# Altium PCB NewTrackerBoard.PcbDoc (part 4 of 4)
Units mm, origin at the board's own origin, x right, y up, seen from the top; angles counter-clockwise.
Board outline 47 x 47 mm, 4 copper layers (L1 (SIG), L2 (GND), L3 (GND), L4 (SIG + PWR)), stack 1.566 mm thick; 77 components, 57 nets, 308 pads, 297 vias.
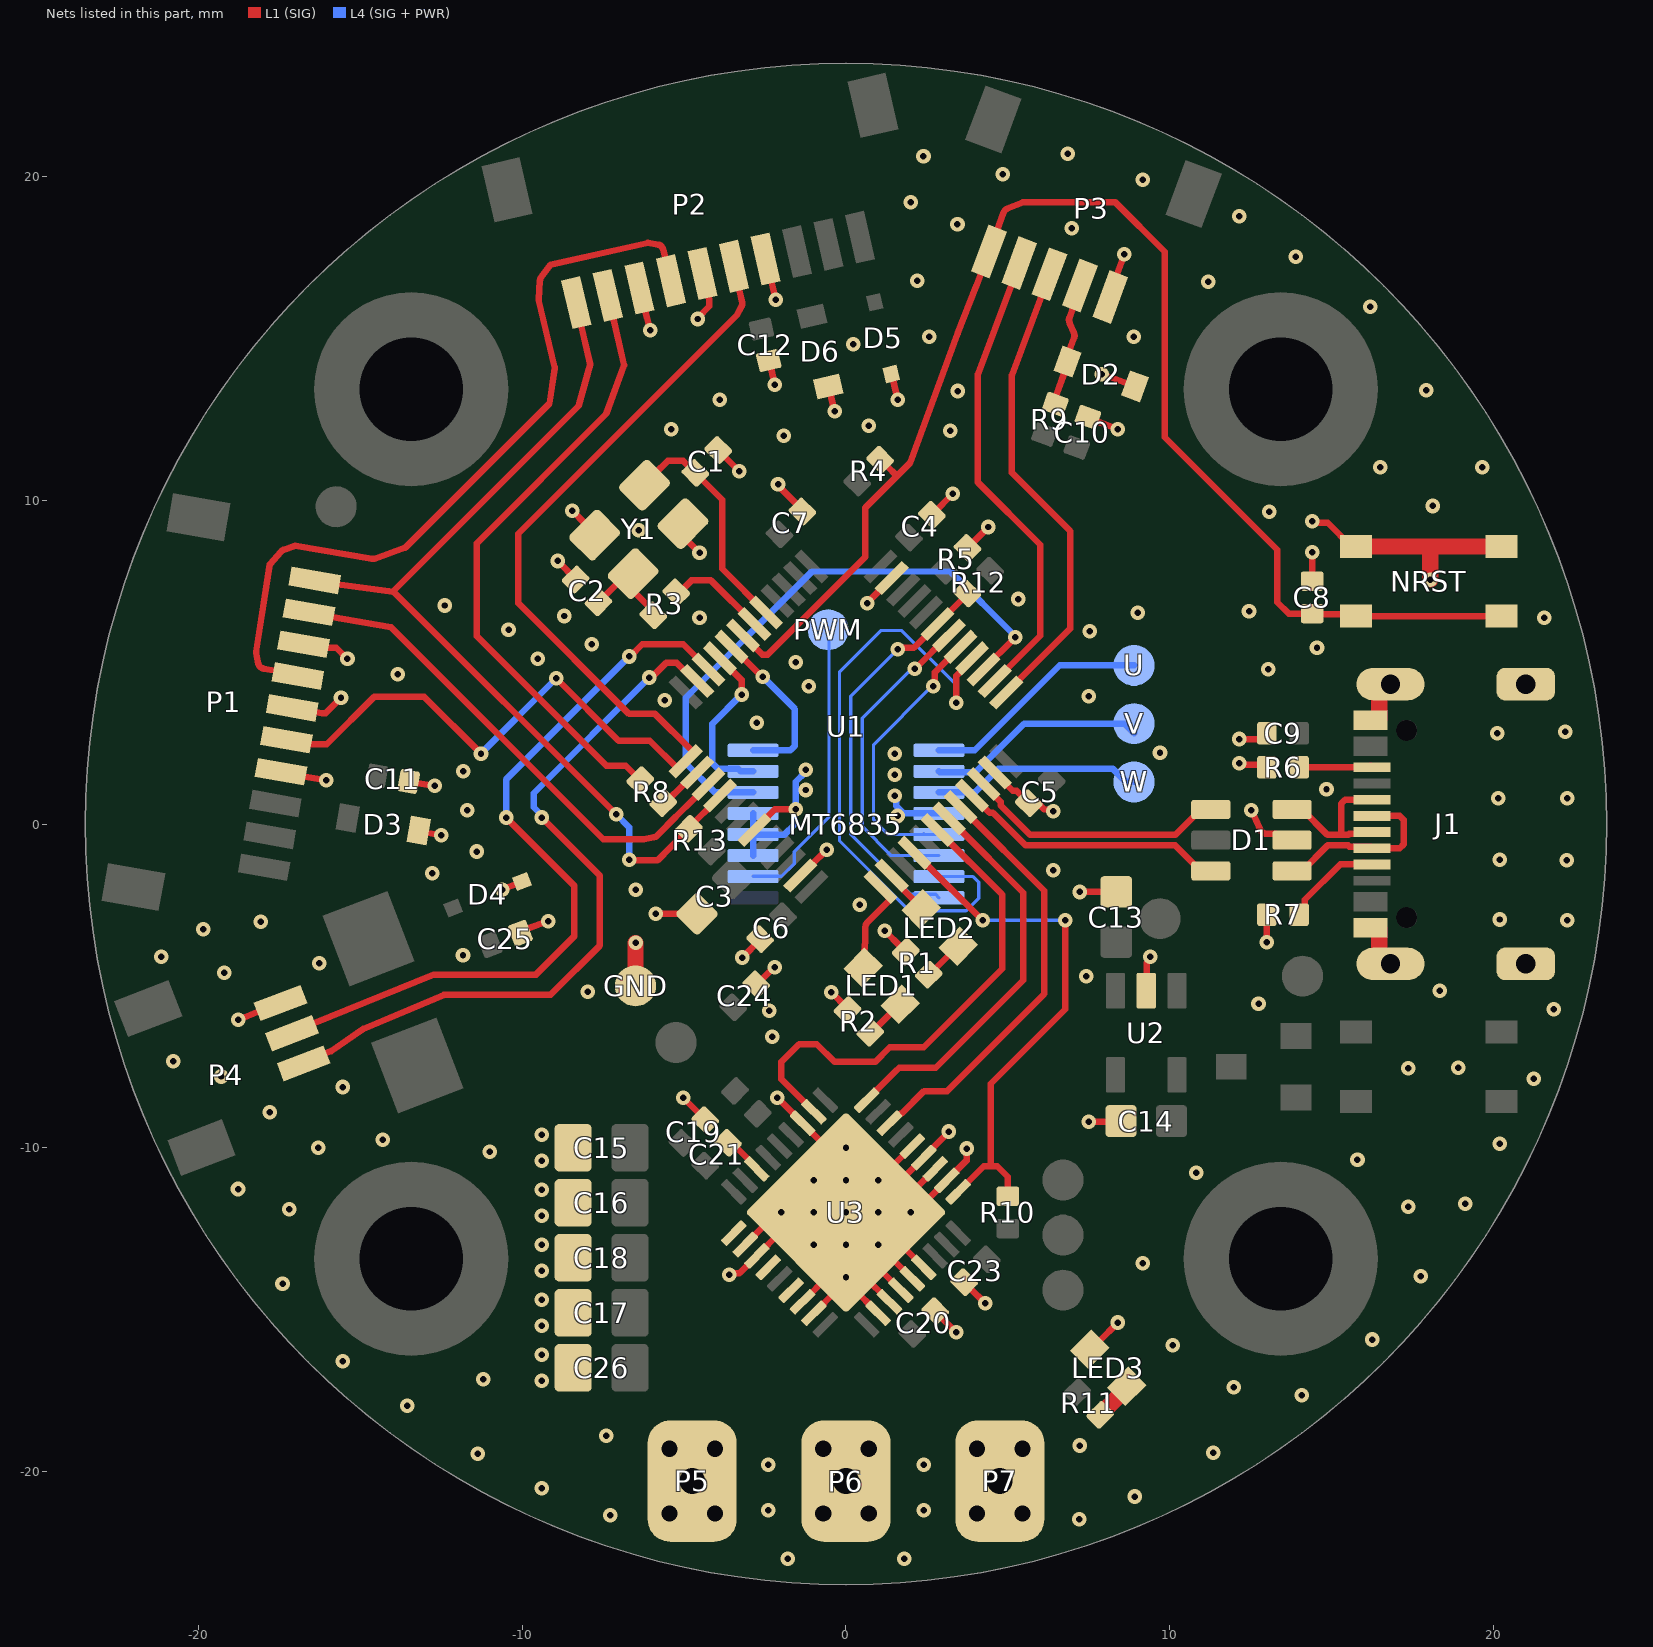
[diagram p4: the nets of this part, all layers, seen from the top]

## Via types
v1: diameter 0.45, hole 0.2, L1 (SIG) to L4 (SIG + PWR), tented both sides, 297 vias

## Nets (pads, with @x,y where several pads share a name; then routed paths per layer and width w, separated by ;. In a path a pad name is that pad's centre, name@x,y a point inside that pad or via, vN(x,y) a via of type N, cw(c..) or ccw(c..) an arc to the next point about the centre after c; other vN are vias at no path point) (continued)
DRV_LED: LED3.A R11.1 | length 1.2
  L1 (SIG) w0.5: R11.1@7.854,-18.254 7.921,-18.179 8.383,-17.717 ccw(c8.029,-17.364) 8.413,-17.684 LED3.A@8.673,-17.373
ENC_U: MT6835.1 U.1 | length 7.1
  L4 (SIG + PWR) w0.2: MT6835.1@2.87,2.275 3.975,2.275 6.6,4.9 U.1@8.9,4.9
ENC_V: MT6835.2 V.1 | length 6.8
  L4 (SIG + PWR) w0.2: MT6835.2@2.87,1.625 2.895,1.6 4,1.6 5.5,3.1 8.6,3.1 V.1@8.9,2.8
ENC_W: MT6835.3 W.1 | length 6.5
  L4 (SIG + PWR) w0.2: MT6835.3@2.87,0.975 3.975,0.975 4.7,1.7 8.248,1.7 8.648,1.3 W.1@8.9,1.3
FAULT_N: R10.1 U1.28 U3.28 | length 16.7
  L1 (SIG) w0.102: v1@6.775,-3 v1(6.775,-2.975)
  L1 (SIG) w0.2: U1.28@2.121,-0.889 2.121,-0.896 2.35,-1.125 2.366,-1.125 4.216,-2.975 v1(4.225,-2.975) ; U3.28@3.465,-11.364 4.253,-10.575 4.475,-10.575 ; R10.1@5,-11.5 5,-10.9 4.675,-10.575 4.475,-10.575 ; v1@6.775,-3 6.775,-5.725 4.475,-8.025 4.475,-10.575
  L4 (SIG + PWR) w0.102: v1(4.225,-2.975) v1(6.775,-2.975)
GND: C1.1 C2.1 C3.1 C4.1 C5.1 C6.1 C7.1 C8.1 C9.1 C10.1 C11.1 C12.2 C13.1 C14.1 C15.1 C16.1 C17.1 C18.1 C19.1 C20.1 C23.1 C24.2 C25.1 C26.1 D1.2 D2.A D3.A D4.1 D5.1 D6.A GND.1 J1.A1_B12 J1.B1_A12 J1.SH1 J1.SH2 J1.SH3 J1.SH4 LED3.C MT6835.4 MT6835.11 MT6835.12 MT6835.13 NRST.3 NRST.4 P1.3 P1.5 P1.7 P2.4 P2.6 P2.8 P3.1 P4.1 R1.1 R2.2 R5.1 R6.2 R7.1 U1.19 U1.23 U1.35 U1.47 U2.2 U3.3 U3.11 U3.12 U3.16 U3.17 U3.20 U3.21 U3.22 U3.23 U3.24 U3.29 U3.30 U3.31 U3.32 U3.37 Y1.2 Y1.4 | length 90.9
  L1 (SIG) w0.2: v1(-18.775,-6.05) -18.113,-5.783 -17.531,-5.5 P4.1@-17.5,-5.5 ; P1.7@-17.454,1.616 -16.793,1.481 v1(-16.05,1.35) ; P1.5@-17.107,3.586 -16.442,3.468 -16.178,3.422 -16.078,3.422 v1(-15.6,3.9) ; P1.7@-16.847,1.415 P1.7@-16.804,1.415 ; P1.3@-16.76,5.555 -16.093,5.452 -16.071,5.448 -15.748,5.448 v1(-15.4,5.1) ; C11.1@-13.508,1.313 -13.311,1.278 -12.742,1.178 ccw(c-12.707,1.375) -12.707,1.175 v1(-12.7,1.175) ; D3.A@-12.994,-0.255 D3.A@-13.2,-0.2 -12.995,-0.263 v1(-12.5,-0.35) ; v1(-10.625,-2.025) -10.14,-1.839 D4.1@-10.007,-1.781 ; C25.1@-10.054,-3.379 -9.906,-3.303 -9.889,-3.251 v1(-9.2,-3) ; v1(-8.9,8.125) -8.9,8.112 -8.354,7.566 C2.1@-8.354,7.554 ; v1(-8.45,9.675) -8.044,9.269 -8.044,9.222 -8.058,9.208 -7.789,8.958 Y1.2@-7.765,8.923 ; P2.8@-6.409,16.656 P2.8@-6.384,16.556 -6.232,16.004 -6.151,15.653 ccw(c-5.956,15.698) -6.15,15.65 ; -6.15,15.649 v1(-6.05,15.25) ; v1(-5.875,-2.775) -5.001,-2.774 C3.1@-4.976,-2.749 ; Y1.4@-5.035,9.277 -5.035,8.885 v1(-4.525,8.375) ; v1(-5.025,-8.45) -5.025,-8.459 -4.346,-9.137 C19.1@-4.346,-9.146 ; v1(-4.575,15.6) -4.575,15.642 -4.225,15.992 -4.225,16.207 ; P2.6@-4.46,17.106 -4.448,17.004 -4.403,16.626 -4.282,16.454 -4.225,16.208 ; C1.1@-3.946,11.554 -3.946,11.546 v1(-3.3,10.9) ; v1(-3.6,-13.925) -3.552,-13.877 -3.291,-13.877 -2.914,-13.5 -2.9,-13.5 -2.9,-13.486 U3.12@-2.758,-13.344 -2.014,-12.6 U3.37@-1.9,-12.6 ; U3.11@-3.338,-13.216 U3.11@-3.111,-12.99 -2.121,-12 v1(-2,-12) v1(-1,-12) v1(0,-12) v1(0,-11) 0,-10.525 -0.725,-9.8 -0.734,-9.809 -0.777,-9.809 -1.225,-9.361 U3.3@-1.225,-9.325 ; v1(-3.2,-4.125) -2.654,-3.579 C6.1@-2.654,-3.554 ; U1.19@-2.828,-0.182 -2.828,-0.178 -2.196,0.454 -1.554,0.454 v1(-1.55,0.45) ; C24.2@-2.624,-4.825 -2.224,-4.425 v1(-2.2,-4.425) ; P2.4@-2.487,17.456 -2.314,16.803 v1(-2.175,16.2) ; C12.2@-2.388,14.313 -2.326,14.122 v1(-2.2,13.575) ; v1(-2.125,-8.45) -1.475,-9.1 -1.45,-9.1 -1.344,-9.206 U3.3@-1.344,-9.231 ; v1(-2.1,10.5) -2.1,10.454 -1.346,9.7 C7.1@-1.346,9.654 ; U1.23@-1.414,-1.596 -1.411,-1.573 -1.054,-1.254 v1(-0.6,-0.8) ; U3.3@-1.35,-9.225 U3.3@-1.344,-9.231 ; U3.16@-1.344,-14.758 -1.344,-14.744 -1.2,-14.6 -1.186,-14.6 -0.7,-14.114 U3.37@-0.7,-14 ; U3.3@-1.344,-9.242 U3.3@-1.344,-9.231 ; D6.A@-0.55,13.516 -0.488,13.312 -0.378,12.836 ccw(c-0.183,12.881) -0.373,12.819 v1(-0.35,12.75) v1@-0.373,12.818 ; v1(-0.45,-5.2) 0.046,-5.696 R2.2@0.046,-5.746 ; U3.37@-0.3,-14.4 -0.3,-14.421 U3.17@-0.99,-15.111 ; U3.37@0.3,-14.4 0.3,-14.421 0.879,-15 0.9,-15 0.99,-15.09 U3.20@0.99,-15.111 ; U3.37@0.6,-14 0.6,-14.014 1.286,-14.7 1.3,-14.7 1.344,-14.744 U3.21@1.344,-14.758 ; v1(0.65,6.825) 0.65,6.828 1.414,7.593 U1.47@1.414,7.596 ; U3.37@1,-13.7 1,-13.707 1.693,-14.4 1.7,-14.4 U3.22@1.697,-14.403 ; v1(1.2,-3.3) 1.7,-3.8 R1.1@1.846,-3.946 ; U3.37@1.4,-13.4 U3.23@2.051,-14.051 ; D5.1@1.4,13.9 1.447,13.762 v1(1.6,13.1) ; U3.37@1.425,-10.525 1.475,-10.525 2.025,-9.975 U3.32@2.025,-9.95 ; U3.37@1.7,-13 1.707,-13 2.2,-13.493 2.2,-13.5 2.397,-13.697 U3.24@2.404,-13.697 ; U3.37@1.75,-10.85 1.769,-10.869 1.838,-10.869 U3.31@2.404,-10.303 2.404,-10.287 3.175,-9.516 v1(3.175,-9.5) ; U3.32@2.026,-9.949 U3.32@2.051,-9.949 ; U3.37@2.075,-11.325 2.089,-11.325 U3.30@2.758,-10.656 ; U3.37@2.6,-11.525 2.875,-11.25 2.875,-11.248 3.725,-10.398 v1(3.725,-10.025) ; C4.1@2.654,9.554 2.725,9.625 v1(3.3,10.2) ; C20.1@2.754,-15.046 2.778,-15.062 2.927,-15.227 v1(3.4,-15.7) ; C23.1@3.646,-14.154 3.823,-14.33 v1@4.293,-14.8 ; R5.1@3.754,8.529 v1(4.4,9.175) ; U1.35@4.596,1.586 4.596,1.596 4.6,1.6 4.6,1.575 5.15,1.025 5.268,1.025 C5.1@5.646,0.646 5.929,0.646 6.128,0.448 6.352,0.448 v1(6.4,0.4) ; v1(7.225,-2.1) 8.345,-2.1 C13.1@8.35,-2.095 ; C10.1@7.471,12.57 7.696,12.456 v1(8.4,12.2) ; v1(7.5,-9.2) 8.131,-9.2 C14.1@8.495,-9.175 ; LED3.C@7.527,-16.227 7.583,-16.129 7.808,-15.992 v1(8.4,-15.4) ; v1(7.9,13.9) 8.735,13.596 D2.A@8.933,13.52 ; P3.1@8.161,16.343 8.197,16.577 8.375,16.983 v1(8.6,17.6) ; U2.2@9.275,-5.15 9.275,-4.925 9.287,-4.912 9.287,-4.28 9.4,-4.168 v1(9.4,-4.1) ; v1(12.15,1.875) 12.198,1.827 12.923,1.827 R6.2@13,1.75 ; v1(12.15,2.625) 12.8,2.625 12.997,2.792 C9.1@13,2.8 ; v1(12.525,0.425) 12.798,-0.184 ccw(c12.98,-0.102) 12.977,-0.301 ; R7.1@12.8,-2.825 13,-3.025 v1(13,-3.65) ; 12.978,-0.302 13.275,-0.305 D1.2@13.78,-0.5 ; C8.1@14.4,7.5 14.4,7.7 v1(14.4,8.4) ; v1(14.4,9.35) 14.448,9.302 14.883,9.302 15.61,8.575 NRST.4@15.75,8.575 ; U3.17@-0.99,-15.111 -1.179,-15.3 -1.2,-15.3 U3.17@-0.99,-15.111
  L1 (SIG) w0.5: GND.1@-6.5,-5 v1(-6.5,-3.675) ; C3.1@-4.652,-2.752 -4.652,-2.773 C3.1@-4.65,-2.775 ; NRST.4@15.75,8.575 18.05,8.575 ; J1.A1_B12@16.195,-3.2 16.42,-3.2 16.47,-3.25 16.47,-4.13 J1.SH1@16.4,-4.2 ; J1.B1_A12@16.195,3.2 16.42,3.2 16.47,3.25 16.47,4.089 16.701,4.32 J1.SH2@16.82,4.32 ; v1(18.05,7.55) 18.05,8.575 ; NRST.3@20.25,8.575 18.05,8.575
  L4 (SIG + PWR) w0.2: MT6835.11@-2.87,-0.975 MT6835.12@-2.87,-0.325 ; MT6835.13@-2.87,0.325 MT6835.12@-2.87,-0.325 ; v1(-1.25,1.675) -1.25,1.607 -1.55,1.307 v1(-1.55,0.45) -1.598,0.402 -1.598,-0.023 -1.9,-0.325 MT6835.12@-2.87,-0.325 ; v1(1.5,0.875) 1.548,0.827 1.548,0.562 1.785,0.325 MT6835.4@2.87,0.325
  other v1: -1.8,-22.7 1.8,-22.7 7.2,-21.475 -7.281,-21.35 -2.4,-21.2 2.4,-21.2 8.925,-20.775 -9.4,-20.525 -2.4,-19.8 2.4,-19.8 -11.375,-19.45 11.35,-19.425 7.219,-19.2 -7.4,-18.9 -13.55,-17.975 14.075,-17.65 11.975,-17.4 -9.4,-17.2 -11.206,-17.15 -15.55,-16.6 -9.4,-16.4 10.094,-16.1 16.25,-15.925 -9.4,-15.5 4.3,-14.8 -9.4,-14.7 -17.406,-14.2 0,-14 17.75,-13.975 -9.4,-13.8 9.169,-13.575 -9.4,-13 -1,-13 0,-13 1,-13 -9.4,-12.1 1,-12 2,-12 -17.2,-11.9 17.375,-11.825 19.125,-11.725 -9.4,-11.3 -18.781,-11.276 -1,-11 1,-11 10.819,-10.775 -9.4,-10.4 15.8,-10.375 -11.006,-10.125 -16.3,-10 0,-10 20.2,-9.875 -14.306,-9.75 -9.4,-9.6 -17.8,-8.9 -15.55,-8.125 21.25,-7.875 -19.3,-7.8 17.369,-7.55 18.919,-7.525 -20.781,-7.325 -2.275,-6.575 -2.375,-5.775 21.869,-5.725 12.744,-5.55 -7.981,-5.176 18.344,-5.15 7.419,-4.7 -19.2,-4.6 -16.275,-4.3 -21.156,-4.1 -11.831,-4.05 -19.85,-3.25 -18.075,-3.025 22.275,-2.975 20.2,-2.95 0.419,-2.5 -6.5,-2.025 -12.781,-1.525 6.4,-1.425 22.269,-1.125 20.2,-1.1 -11.4,-0.85 1.592,0.248 -11.7,0.425 20.15,0.8 22.275,0.8 -1.25,1.05 14.844,1.075 1.5,1.525 -11.825,1.625 1.5,2.175 9.7,2.2 20.119,2.8 22.219,2.85 -2.756,3.125 -5.6,3.825 7.5,3.95 -1.156,4.25 -13.85,4.625 13.05,4.775 -1.55,5 -9.525,5.1 14.55,5.45 -7.85,5.55 7.525,5.95 -10.425,6 -4.525,6.375 21.575,6.375 -8.706,6.425 9.019,6.524 12.45,6.575 -12.4,6.75 5.325,6.95 -6.4,9.075 13.075,9.65 18.119,9.824 16.5,11.025 19.65,11.025 -1.925,12 3.225,12.15 -5.4,12.2 0.7,12.3 -3.9,13.1 3.45,13.375 17.925,13.4 0.219,14.824 2.575,15.05 8.894,15.05 16.2,15.975 11.194,16.75 2.2,16.775 13.9,17.525 6.975,18.4 3.444,18.525 12.144,18.775 1.994,19.2 9.169,19.9 4.844,20.075 2.394,20.625 6.85,20.7
NRST: C8.2 NRST.1 NRST.2 P3.5 R4.1 U1.7 | length 43.5
  L1 (SIG) w0.2: U1.7@-3.532,6.182 -3.248,5.898 U1.7@-3.182,5.828 -2.586,5.233 -2.421,5.233 0.6,8.254 0.6,9.775 1.575,10.75 ; R4.1@1.054,11.254 1.149,11.218 1.239,11.086 1.575,10.75 ; 4.018,16.605 3.45,15.15 1.975,11.15 1.575,10.75 ; 4.019,16.606 ccw(c3.832,16.678) 4.024,16.62 cw(c4.215,16.562) 4.027,16.631 4.184,17.05 P3.5@4.416,17.683 ; P3.5@4.129,17.07 P3.5@4.213,17.25 ; P3.5@4.395,17.692 4.402,17.711 4.664,18.333 4.867,18.89 cw(c5.055,18.821) 4.979,19.007 5.461,19.2 8.325,19.2 9.85,17.675 9.85,11.95 13.325,8.475 13.325,6.85 13.675,6.5 C8.2@14.4,6.5 14.65,6.486 15.355,6.486 NRST.2@15.75,6.425 16.145,6.423 19.855,6.423 20.243,6.421 NRST.1@20.25,6.425
OSC: C2.2 R3.1 Y1.3 | length 3
  L1 (SIG) w0.2: C2.2@-7.646,6.846 -6.943,7.55 -6.875,7.55 -6.69,7.735 Y1.3@-6.577,7.735 -6.577,7.202 -5.954,6.579 R3.1@-5.954,6.446
OSC_IN: C1.2 U1.5 Y1.1 | length 7.3
  L1 (SIG) w0.2: Y1.1@-6.223,10.465 -5.882,10.843 -5.5,11.225 -5.032,11.225 C1.2@-4.654,10.846 -3.825,10.018 -3.825,7.886 U1.5@-2.475,6.536
OSC_OUT: R3.2 U1.6 | length 3.1
  L1 (SIG) w0.2: R3.2@-5.246,7.154 -5.146,7.154 -4.775,7.525 -4.171,7.525 U1.6@-2.828,6.182
OUT1: P5.1 U3.10
OUT2: P6.1 U3.13
OUT3: P7.1 U3.15
PWM: MT6835.10 PWM.1 | length 9
  L4 (SIG + PWR) w0.102: MT6835.10@-2.87,-1.625 -2.862,-1.617 -1.992,-1.617 -1.6,-1.225 -1.6,-0.85 -0.523,0.227 -0.523,5.848 PWM.1@-0.525,5.85
RETURN: P1.4 P2.7 | length 24.3
  L1 (SIG) w0.2: -17.377,8.467 ccw(c-17.309,8.279) -17.459,8.411 -17.8,8.025 -18.225,5.3 -18.152,4.952 ccw(c-17.956,4.993) -17.991,4.796 -17.591,4.726 P1.4@-16.933,4.57 ; -17.376,8.467 -17.019,8.595 -14.648,8.19 -14.631,8.187 -14.579,8.187 -13.61,8.54 -9.159,12.991 -9.003,14.076 -9.003,14.114 -9.498,16.196 -9.454,16.79 cw(c-9.255,16.776) -9.414,16.897 -9.125,17.275 -6.125,17.95 -5.805,17.897 cw(c-5.838,17.699) -5.643,17.744 -5.572,17.436 P2.7@-5.41,16.781
S_LED1: LED1.C R2.1 | length 1.3
  L1 (SIG) w0.2: R2.1@0.754,-6.454 0.939,-6.286 1.405,-5.821 LED1.C@1.673,-5.573
S_LED2: LED2.C R1.2 | length 1.3
  L1 (SIG) w0.2: R1.2@2.554,-4.654 2.742,-4.489 3.207,-4.023 3.312,-3.984 LED2.C@3.473,-3.773
SPI1_CS: P1.1 P2.10 R13.2 U1.16 | length 28.7
  L1 (SIG) w0.2: P1.1@-16.412,7.525 -16.384,7.484 -16.374,7.469 -16.317,7.413 P1.1@-16.028,7.362 ; P1.1@-15.725,7.4 -14,7.175 -13.991,7.191 v1(-7.1,0.3) ; -13.988,7.187 -8.253,12.922 -7.975,13.924 ; P2.10@-8.358,16.206 -8.336,16.105 -8.216,15.546 -7.903,14.19 -7.975,13.926 ; v1(-6.7,-1.1) -6.675,-1.125 -5.825,-1.125 -5.625,-0.925 -5.625,-0.918 R13.2@-4.854,-0.146 -4.854,-0.116 -3.987,0.75 -3.975,0.75 -3.889,0.836 U1.16@-3.889,0.879
  L4 (SIG + PWR) w0.2: v1(-7.1,0.3) -6.7,-0.1 v1(-6.7,-1.1)
SPI1_MISO: P2.9 R8.2 | length 19.2
  L1 (SIG) w0.2: P2.9@-7.277,16.324 -7.224,15.775 -6.855,14.176 -7.405,12.67 -11.4,8.675 -11.4,5.8 -7.4,1.8 -6.8,1.8 R8.2@-6.354,1.354
SPI1_MISO2: R8.1 U1.14 | length 1.5
  L1 (SIG) w0.2: R8.1@-5.646,0.646 -5.591,0.646 -4.975,1.262 -4.957,1.243 -4.614,1.586 U1.14@-4.596,1.586
SPI1_MOSI: P1.2 U1.15 | length 16
  L1 (SIG) w0.2: P1.2@-16.421,6.375 P1.2@-16.586,6.54 -15.925,6.404 -14.048,6.073 -7.5,-0.475 -6.25,-0.475 -5.934,-0.412 -5.875,-0.4 -5.832,-0.357 -5.532,-0.057 -5.532,-0.047 -4.953,0.532 -4.943,0.532 U1.15@-4.243,1.232
SPI1_SCK: P1.6 P2.5 U1.13 | length 36.4
  L1 (SIG) w0.2: P1.6@-17.2,2.6 -17.065,2.465 -16.213,2.465 -16.209,2.46 -16.043,2.46 -14.579,3.925 -13.025,3.925 v1(-11.275,2.175) ; v1(-8.95,4.5) -7.025,2.575 -6.06,2.575 -5.224,1.739 -5.15,1.739 U1.13@-4.95,1.939 ; U1.13@-4.8,2.3 -5.9,3.4 -6.7,3.4 -10.125,6.825 -10.125,8.964 -3.375,15.714 -3.228,15.997 -3.205,16.041 -3.205,16.112 -3.334,16.673 P2.5@-3.486,17.331
  L4 (SIG + PWR) w0.2: v1(-11.275,2.175) v1(-8.95,4.5)
SPI3_CS: MT6835.8 R12.2 U1.43 | length 12.7
  L1 (SIG) w0.2: v1(1.6,5.4) 1.648,5.448 2.098,5.448 U1.43@2.832,6.182 ; U1.43@2.828,6.182 U1.43@2.832,6.182 ; R12.2@3.746,7.121 3.746,7.096 U1.43@2.832,6.182
  L4 (SIG + PWR) w0.102: v1(1.6,5.4) 0.15,3.95 0.15,-0.323 2,-2.173 2.768,-2.173 MT6835.8@2.87,-2.275
SPI3_MISO: MT6835.5 U1.41 | length 8.7
  L1 (SIG) w0.2: v1(2.7,4.25) 2.748,4.298 2.748,4.687 U1.41@3.536,5.475
  L4 (SIG + PWR) w0.102: v1(2.7,4.25) 2.65,4.25 0.85,2.45 0.85,0.125 1.3,-0.325 2.375,-0.325 2.4,-0.3 2.425,-0.325 MT6835.5@2.87,-0.325
SPI3_MOSI: MT6835.6 U1.42 | length 9.8
  L1 (SIG) w0.2: v1(2.125,4.8) 2.139,4.8 3.168,5.828 U1.42@3.182,5.828
  L4 (SIG + PWR) w0.102: v1(2.125,4.8) 2.032,4.8 0.5,3.268 0.5,-0.075 1.4,-0.975 MT6835.6@2.87,-0.975
SPI3_SCK: MT6835.7 U1.40 | length 19.3
  L1 (SIG) w0.2: v1@3.406,3.756 3.406,4.574 3.889,5.057 U1.40@3.889,5.121
  L4 (SIG + PWR) w0.102: MT6835.7@2.87,-1.625 3.925,-1.625 4.1,-1.8 4.1,-2.29 3.708,-2.682 1.957,-2.682 -0.2,-0.525 -0.2,4.7 1.075,5.975 1.725,5.975 3.4,4.3 v1(3.4,3.75)
STATUS_LED1: LED1.A U1.25 | length 2.9
  L1 (SIG) w0.2: LED1.A@0.527,-4.427 0.57,-3.953 0.599,-3.608 ccw(c0.4,-3.591) 0.6,-3.591 0.6,-3.183 cw(c0.8,-3.183) 0.659,-3.041 1.368,-2.332 U1.25@1.061,-1.95
STATUS_LED2: LED2.A U1.26 | length 1.5
  L1 (SIG) w0.2: U1.26@1.5,-1.7 U1.26@1.414,-1.596 1.498,-1.697 1.729,-1.985 2.134,-2.39 LED2.A@2.327,-2.627
SWCLK: P3.4 U1.38 | length 14.5
  L1 (SIG) w0.2: U1.38@4.596,4.414 4.7,4.55 4.732,4.55 6,5.818 6,8.625 4.075,10.55 4.075,13.89 5.125,16.698 P3.4@5.358,17.322
SWDIO: P3.3 U1.37 | length 14.7
  L1 (SIG) w0.2: U1.37@4.95,4.061 6.925,6.036 6.925,9.05 5.125,10.85 5.125,13.868 6.053,16.351 P3.3@6.29,16.983
TIM1_CH1: U1.30 U3.2 | length 15.5
  L1 (SIG) w0.2: U3.2@-0.99,-8.889 -2,-7.879 -2,-7.35 -1.45,-6.8 -0.9,-6.8 -0.35,-7.35 0.9,-7.35 1.35,-6.9 2.4,-6.9 4.825,-4.475 4.825,-2.179 U1.30@2.828,-0.182
TIM1_CH2: U1.31 U3.36 | length 12.3
  L1 (SIG) w0.2: U3.36@0.636,-8.535 1.524,-7.648 1.643,-7.529 2.771,-7.529 5.475,-4.825 5.475,-2.121 3.4,-0.046 3.4,0 3.228,0.172 U1.31@3.182,0.172
TIM1_CH3: U1.32 U3.34 | length 13.3
  L1 (SIG) w0.2: U3.34@1.344,-9.242 1.386,-9.242 1.679,-8.949 1.711,-8.949 2.411,-8.25 3.125,-8.25 6.125,-5.25 6.125,-2.064 3.661,0.4 3.6,0.4 3.536,0.464 U1.32@3.536,0.525
TIM2_CH1: MT6835.16 U1.8 | length 5.3
  L1 (SIG) w0.2: U1.8@-3.536,5.475 -3.525,5.475 -3.425,5.375 -3.418,5.375 -2.593,4.55 v1(-2.575,4.55)
  L4 (SIG + PWR) w0.2: MT6835.16@-2.87,2.275 -1.717,2.275 -1.577,2.416 -1.577,3.552 -2.55,4.525 -2.55,4.6 -2.575,4.575 v1(-2.575,4.55)
TIM2_CH2: MT6835.15 U1.9 | length 5.3
  L1 (SIG) w0.2: U1.9@-3.889,5.121 -3.889,5.114 -3.225,4.45 v1(-3.225,4)
  L4 (SIG + PWR) w0.2: v1(-3.225,4) -4.125,3.1 -4.125,1.875 -3.955,1.705 -3.33,1.705 -3.25,1.625 MT6835.15@-2.87,1.625
TIM2_ETR: MT6835.14 U1.39 | length 18.5
  L1 (SIG) w0.2: U1.39@4.243,4.768 4.243,4.78 5.225,5.763 v1(5.225,5.775)
  L4 (SIG + PWR) w0.2: MT6835.14@-2.87,0.975 -4.05,0.975 -4.95,1.875 -4.95,3.9 -1.05,7.8 3.225,7.8 5.225,5.8 v1(5.225,5.775)
USART2_RX: P4.3 U1.11 | length 22.8
  L1 (SIG) w0.2: P4.3@-16.751,-7.354 -16.141,-7.108 -15.906,-7.013 -15.885,-7.005 -14.95,-6.35 cw(c-14.835,-6.514) -14.913,-6.33 -12.421,-5.275 -9.125,-5.275 -7.6,-3.75 -7.6,-1.6 v1(-9.4,0.2) ; v1(-6.075,4.525) -6.007,4.525 -5.557,4.975 -5.231,4.975 -4.67,4.414 U1.11@-4.596,4.414
  L4 (SIG + PWR) w0.2: v1(-9.4,0.2) -9.4,0.268 -9.65,0.518 -9.65,0.95 v1(-6.075,4.525)
USART2_TX: P4.2 U1.10 | length 23.6
  L1 (SIG) w0.2: P4.2@-17.125,-6.427 -16.499,-6.174 -12.728,-4.651 -12.725,-4.65 -9.575,-4.65 -8.4,-3.475 -8.4,-1.9 v1(-10.5,0.2) ; v1(-6.7,5.175) -6.666,5.175 -6.291,5.55 -5.025,5.55 U1.10@-4.25,4.775 ; U1.10@-4.243,4.768 U1.10@-4.225,4.775
  L4 (SIG + PWR) w0.2: v1(-10.5,0.2) -10.5,1.375 v1(-6.7,5.175)
USB_CC1: J1.A5 R7.2 | length 3.1
  L1 (SIG) w0.2: R7.2@14,-2.8 14.174,-2.626 14.174,-2.343 15.267,-1.25 15.95,-1.25 16,-1.2 16.05,-1.25 J1.A5@16.245,-1.25
USB_CC2: J1.B5 R6.1 | length 2.3
  L1 (SIG) w0.2: R6.1@14,1.75 16.15,1.75 16.2,1.8 16.245,1.755 J1.B5@16.245,1.75
USB_N: D1.6 U1.33 | length 8.3
  L1 (SIG) w0.2: U1.33@3.889,0.879 3.907,0.879 4.436,0.35 4.54,0.35 5.554,-0.663 10.174,-0.663 10.96,-1.45 D1.6@11.27,-1.45
USB_P: D1.4 U1.34 | length 8.1
  L1 (SIG) w0.2: U1.34@4.243,1.232 4.243,1.218 4.775,0.685 4.775,0.578 5.689,-0.336 10.174,-0.336 10.96,0.45 D1.4@11.27,0.45
USBCONN_N: D1.1 J1.A7 J1.B7 | length 5.6
  L1 (SIG) w0.2: D1.1@13.78,-1.45 14.09,-1.45 14.876,-0.663 15.509,-0.663 15.546,-0.7 16.195,-0.7 J1.B7@16.245,-0.75 17.108,-0.75 17.225,-0.633 17.225,0.133 17.108,0.25 J1.A7@16.245,0.25
USBCONN_P: D1.3 J1.A6 J1.B6 | length 4.7
  L1 (SIG) w0.2: D1.3@13.78,0.45 14.09,0.45 14.876,-0.336 15.3,-0.336 15.509,-0.336 15.546,-0.3 16.195,-0.3 J1.A6@16.245,-0.25 ; 15.3,-0.239 15.3,0.633 15.417,0.75 J1.B6@16.245,0.75
VCP: C21.1 U3.7 | length 1.2
  L1 (SIG) w0.2: C21.1@-3.646,-9.846 -3.529,-9.846 -2.758,-10.617 U3.7@-2.758,-10.656
VSENSE: D2.K P3.2 R9.2 | length 3.9
  L1 (SIG) w0.2: R9.2@6.471,12.97 6.468,13.184 6.756,13.977 D2.K@6.842,14.28 6.892,14.598 7.047,15.024 ; 6.905,15.482 7.042,15.174 cw(c6.859,15.093) 7.048,15.025 ; 6.905,15.483 cw(c7.088,15.563) 6.9,15.631 7.045,16.031 P3.2@7.221,16.685
pads on no net: J1. J1.A8 J1.B8 P1.P-MOUNT1 P1.P-MOUNT2 P2.P-MOUNT1 P2.P-MOUNT2 P3.P-MOUNT1 P3.P-MOUNT2 P4.P-MOUNT1 P4.P-MOUNT2 U1.2 U1.3 U1.4 U1.12 U1.17 U1.18 U1.22 U1.29 U1.44 U1.46 U2.4 U3.4 U3.8 U3.14 U3.18

## Polygon pours and split planes (outlines as drawn)
OUT3 on L1 (SIG) "NONET_L-01_P-001" (solid, pour order 63): -2.375,-15.825 -2.375,-14.875 -2.125,-14.625 -1.925,-14.825 -1.925,-15.125 0.05,-17.1 2.675,-17.1 3.175,-17.6 4.05,-18.475 4.05,-19.35 3.6,-19.35 2.1,-17.85 -0.35,-17.85
+VM on L1 (SIG) "NONET_L-01_P-001" (solid, pour order 38): -9.95,-8.6 -10.6,-8.6 -10.75,-8.75 -14.5,-7.2 -13.85,-8.925 -13.7,-9.2 -10.55,-9.2
+USB5V on L1 (SIG) "NONET_L-01_P-001" (solid, pour order 74): 18.05,2.7 18.2,2.55 18.2,-0.3 17.5,-0.3 17.5,1.5 16.9,2.1 16.7,2.1 15.8,2.7
+USB5V on L1 (SIG) "NONET_L-01_P-001" (solid, pour order 73): 18.05,-2.7 18.2,-2.55 18.2,-0.3 17.5,-0.3 17.5,-1.568 16.879,-2.1 15.7,-2.1 15.7,-2.7 16.7,-2.7
+5V on L1 (SIG) "NONET_L-01_P-001" (solid, pour order 95): -18.599,0.505 -18.604,0.5 -20,0.5 -20.3,0.8 -20.298,0.81 -20.8,0.9 -25.7,0.9 -23.4,12.5 -18.1,19.1 -11.2,22.9 -11.1,22.9 -2.3,25 -1.9,20.4 -1.7,20.4 -1.409,20.109 -1.409,18.598 -1.05,17 -1.65,16.85 -2,18.375 -2.475,18.85 -4.45,18.85 -9.938,17.587 -13.55,13.975 -13.55,13.95 -18.1,9.4 -18.775,6.05 -18.775,1.5 -18.335,1.06 -16.8,0.8 -16.9,0.2
+VBAT on L1 (SIG) "NONET_L-01_P-001" (solid, pour order 77): -18.6,0.2 -19.5,0.2 -20.3,1 -20.3,2.1 -20.9,2.7 -24.4,2.7 -24.4,-1.4 -24.2,-1.6 -18.9,-1.6
FAULT_N on L1 (SIG) "NONET_L-01_P-001" (solid, pour order 96): 4.375,-10.425 4.325,-10.475 4.325,-10.6 4.625,-10.6 4.625,-10.475 4.575,-10.425
+VM on L1 (SIG) "NONET_L-01_P-001" (solid, pour order 40): -3.883,-10.741 -3.886,-10.739 -3.886,-10.566 -6.903,-7.55 -7.055,-7.55 -6.147,-8.458 -6.147,-11.405 -6,-11.399 -5.7,-11.1 -4.1,-11.1 -3.3,-11.9 -3.013,-11.613
+VM on L1 (SIG) "NONET_L-01_P-001" (solid, pour order 43): -6,-8.6 -7.05,-7.55 -7.138,-7.55 -6,-8.688
+5V on L1 (SIG) "NONET_L-01_P-001" (solid, pour order 82): -14.7,2.1 -14.7,2.975 -14.4,3.275 -13,3.275 -12.725,3 -12.725,2.175 -12.975,1.925 -14.525,1.925
+VBAT on L1 (SIG) "NONET_L-01_P-001" (solid, pour order 81): 0.6,19.1 0.6,20.5 -0.3,21.4 -0.3,23.8 -3.7,23.8 -3.7,20.7 -3.2,20.2 -1.7,20.2 -1.1,19.6 -1.1,18.7
+VBAT on L1 (SIG) "NONET_L-01_P-001" (solid, pour order 79): 1,17.4 -0.7,17 -1.1,18.7 0.6,19.1
+VM on L1 (SIG) "NONET_L-01_P-001" (solid, pour order 52): 4.375,-18 3.125,-16.75 2.45,-16.75 0.425,-16.75 -0.463,-15.863 0.387,-15.013 1.075,-15.7 1.4,-15.7 2,-15.1 2.7,-15.8 3.1,-16.2 6.3,-16.2 7.65,-17.55 7.2,-18
+VM on L1 (SIG) "NONET_L-01_P-001" (solid, pour order 44): -3.6,-12.2 -3.725,-12.2 -5.2,-13.675 -5.2,-17.1 -6,-17.9 -6,-11.4 -5.7,-11.1 -4.1,-11.1 -3.3,-11.9
+5V on L1 (SIG) "NONET_L-01_P-001" (solid, pour order 92): 12.6,-8.9 12.5,-8.8 12.5,-8.2 12.6,-8.1 12.6,-7.4 12.8,-7.2 14.2,-7.2 14.7,-7.7 14.7,-8.6 14.4,-8.9
+VM on L1 (SIG) "NONET_L-01_P-001" (solid, pour order 64): 6.3,-16.2 6.3,-15.6 7.1,-14.8 7.1,-14.1 6.2,-14.1 4.1,-16.2 3.5,-16.2
OUT2 on L1 (SIG) "NONET_L-01_P-001" (solid, pour order 62): -2.825,-14.325 -2.625,-14.125 -2.825,-13.925 -3.55,-14.65 -3.55,-17.15 -1.225,-19.475 -1.225,-20.6 -1.15,-20.6 -1.1,-20.55 -1.1,-19.325 0.075,-19.325 -1.025,-18.225 -2.825,-16.425
OUT1 on L1 (SIG) "NONET_L-01_P-001" (solid, pour order 60): -3.7,-13.075 -4.05,-13.425 -4.05,-13.925 -4.05,-17.9 -5.225,-17.9 -4.875,-17.55 -4.875,-13.85 -3.9,-12.875
OUT3 on L1 (SIG) "NONET_L-01_P-001" (solid, pour order 59): -1.475,-13.975 -2.125,-14.625 -1.925,-14.825 -1.275,-14.175
OUT2 on L1 (SIG) "NONET_L-01_P-001" (solid, pour order 58): -2.175,-13.275 -1.975,-13.475 -2.625,-14.125 -2.825,-13.925
OUT1 on L1 (SIG) "NONET_L-01_P-001" (solid, pour order 57): -3.225,-12.2 -3.025,-12.4 -3.7,-13.075 -3.9,-12.875
OUT1 on L1 (SIG) "NONET_L-01_P-001" (solid, pour order 34): -5.225,-19.3 -4.05,-19.3 -4.05,-17.9 -5.225,-17.9
+3V3 on L1 (SIG) "NONET_L-01_P-001" (solid, pour order 56): 9.85,-7.1 9.95,-7 10.5,-7 10.6,-7.1 10.6,-9.075 10.875,-9.35 10.875,-9.425 8.7,-11.6 6.6,-11.6 5.2,-10.2 5.2,-8 5.6,-7.6 6.6,-7.6 7,-8 7,-10.1 7.3,-10.4 8.5,-10.4 9.5,-9.4 9.5,-8.55 9.85,-8.2
+D3V3 on L1 (SIG) "NONET_L-01_P-001" (solid, pour order 54): 4.5,-12.1 6.6,-12.1 6.6,-13.3 4.5,-13.3
+D3V3 on L1 (SIG) "NONET_L-01_P-001" (solid, pour order 53): 2.95,-13.8 3.1,-13.8 3.4,-13.5 3.8,-13.5 4.2,-13.9 4.4,-13.9 5.4,-12.9 5.4,-12.1 3.3,-12.1 2.35,-13.05 2.35,-13.2
+VM on L1 (SIG) "NONET_L-01_P-001" (solid, pour order 45): -6,-17.9 -7.2,-17.9 -7.4,-17.7
GND on L1 (SIG) "NONET_L-01_P-001" (solid, pour order 48): -7.7,-17.7 -7.9,-17.9 -9.7,-17.9 -9.9,-17.7
+VM on L1 (SIG) "NONET_L-01_P-001" (solid, pour order 46): -6,-17.9 -6,-17.7 -7.4,-17.7
+VM on L1 (SIG) "NONET_L-01_P-001" (solid, pour order 36): -7.7,-8.8 -7.9,-8.6 -9.95,-8.6 -10.15,-8.8 -13.185,-8.8 -13.4,-8.5 -13.8,-7.2 -13.45,-7.55 -7.138,-7.55 -6,-8.688 -6,-17.7 -7.4,-17.7 -7.4,-9.1
GND on L1 (SIG) "NONET_L-01_P-001" (solid, pour order 39): -9.65,-8.9 -9.9,-9.15 -9.9,-17.7 -7.7,-17.7 -7.7,-9.175 -7.975,-8.9
+VBAT on L1 (SIG) "NONET_L-01_P-001" (solid, pour order 35): -16.9,-0.1 -18.6,0.2 -18.9,-1.6 -16.3,-2.9 -15.5,-5.1 -13.2,-4.2 -14,-2
+VM on L4 (SIG + PWR) "NONET_L-01_P-001" (solid, pour order 66): 7,-15.6 7,-16.9 7,-17.5 5.6,-18.9 -5.15,-18.9 -4.6,-15.6 -4.5,-15.6 -3.5,-16.6 3.7,-16.6 5.3,-15 6.4,-15
GND on L4 (SIG + PWR) "NONET_L-01_P-001" (solid, remove dead copper, pour order 91): -24,-24.5 35,-24.5 35,25 -24,25
+3V3 on L4 (SIG + PWR) "NONET_L-01_P-001" (solid, pour order 88): -3.1,-3.3 -3.875,-4.075 -3.875,-4.85 -4.15,-5.125 -4.825,-5.125 -5.3,-4.65 -5.3,-1.8 -5.3,-1.3 -5.1,-1.1 -4.6,-1.1 -4.4,-1.3 -4.4,-1.7 -4.1,-2 -1.8,-2 -0.5,-3.3 -0.1,-3.7 1.5,-3.7 6.25,-8.45 5.45,-9.25 0.8,-4.6 -1.1,-4.6 -2.4,-3.3
+VM on L4 (SIG + PWR) "NONET_L-01_P-001" (solid, pour order 65): -4.988,-9.387 -4.988,-15.112 -4.5,-15.6 -4.5,-18.1 -5.5,-19.1 -7.1,-17.5 -7.1,-9.4 -6.55,-8.85 -5.525,-8.85
+5V on L4 (SIG + PWR) "NONET_L-01_P-001" (solid, pour order 85): 7.6,-12.9 4.4,-12.9 1.4,-15.9 -3.1,-15.9 -4.225,-14.775 -4.225,-7.9 -4.825,-7.3 -12.7,-7.3 -14.8,-5.2 -14.8,-1 -13.7,-1 -13.7,-3.7 -11.5,-5.9 -3.9,-5.9 -2.95,-6.85 -2.95,-13.25 -1.575,-14.625 0.552,-14.625 3.623,-11.6 6.9,-11.6 11.5,-7 14.4,-7 14.6,-7.2 14.7,-7.3 14.7,-8.6 14.6,-8.7 14.4,-8.9 11.6,-8.9
+VBAT on L4 (SIG + PWR) "NONET_L-01_P-001" (solid, pour order 76): -24,-2 -19.25,-2 -18.5,-1.25 -18.5,4.75 -15.75,7.5 -11.5,7.5 -7.262,11.738 -7.262,15.988 -4.75,18.5 0.25,18.5 1,19.25 1,25 -8.5,25 -24,9.5
+5V on L4 (SIG + PWR) "NONET_L-01_P-001" (solid, pour order 84): -12.6,2.1 -13.7,1 -13.7,-1 -14.8,-1 -14.8,3.5 -13.1,3.5 -12.6,3
+5V on L4 (SIG + PWR) "NONET_L-01_P-001" (solid, pour order 86): -14.8,3.5 -15.3,3 -15.3,-4.7 -14.8,-5.2
+3V3 on L4 (SIG + PWR) "NONET_L-01_P-001" (solid, pour order 87): 10.3,-0.4 9.9,-0.8 8.2,-0.8 7.675,-0.275 7.675,0.575 7.4,0.85 7.175,0.85 6.9,0.575 6.9,-0.525 7.975,-1.6 9.9,-1.6 10.3,-2 10.3,-4.1 7.5,-6.9 6.3,-6.9 5.2,-8 5.2,-10.2 5.5,-10.5 6.7,-10.5 6.8,-10.4 7,-10.2 7,-8.9 8,-8 11.6,-4.4 11.6,6.8 10.3,6.8
+3V3 on L4 (SIG + PWR) "NONET_L-01_P-001" (solid, pour order 89): 6.3,-6.9 4.5,-6.9 5.4,-7.8
+3V3 on L4 (SIG + PWR) "NONET_L-01_P-001" (solid, pour order 90): 10,6.8 10.3,6.5 11.6,6.5 11.6,8.5 8.6,11.5 -0.5,11.5 -3.3,8.7 -3.3,8 -3,7.7 -2.4,7.7 -1.2,8.9 3.6,8.9 4.7,7.8 9,7.8
no net on Top Solder "NONET_L-01_P-001" (solid): -7.3,-17.6 -7.2,-17.7 -6.1,-17.7 -6,-17.6 -6,-9.2 -6.1,-9.1 -7.2,-9.1 -7.3,-9.2
no net on Top Solder "NONET_L-01_P-001" (solid): -9.1,-17.6 -9,-17.7 -7.9,-17.7 -7.8,-17.6 -7.8,-9.2 -7.9,-9.1 -9,-9.1 -9.1,-9.2
GND on L2 (GND) "NONET_L-01_P-001" (solid, pour order 0): -24,-24 -24,24 28,24 28,-24
GND on L3 (GND) "NONET_L-01_P-001" (solid, pour order 2): -24,-24 -24,24 32,24 32,-24

## Silkscreen, mask and mechanical layers (free items; w line width, h text height)
Top Overlay:
  drawing of 14 lines, arcs and shapes, not listed
  text "SWD" at 3.027,15.849 h0.8 r339.5
  text "Output" at -7.52,13.489 h0.8 r13
  text "12-24V" at -11.825,8.709 h0.8 r45
  text "2A" at -10.975,7.809 h0.8 r45
  text "UQ Biorobot" at 6.379,3.679 h0.8
  text "Input" at -14.119,3.541 h0.8 r80
  text "G431C6" at -10.321,2.554 h0.8
  text "Driver" at 6.389,2.367 h0.8
  text "DC" at -16.148,-2.349 h0.8 r20
  text "L2" at 4.6,-5.741 h0.8 r45
  text "L1" at 2.9,-7.441 h0.8 r45
  text "DRV" at 3.55,-10.041 h0.8 r45
  text "8313" at 4.4,-10.891 h0.8 r45
  text "UART" at -17.904,-11.322 h0.8 r21
  text "A" at -5.017,-17.946 h0.8
  text "B" at -0.267,-17.946 h0.8
  text "C" at 4.483,-17.946 h0.8
  text "BULK" at -10.446,-19.146 h0.8
  text "MOTOR" at 8.6,-20.141 h0.8 r45
  text "CAP" at -9.546,-20.546 h0.8
Bottom Overlay:
  text "UQ Biorobot" at 7.744,18.238 h1.52
  text "Gimbal Driver" at 9.141,16.238 h1.52
  text "Rev 1.0" at 3.166,14.5 h1
  text "P1\P2" at -15.251,7.5 h1
  text "P4" at -11.667,7.5 h1
  text "P3" at -6.667,7.5 h1
  text "1" at -20.35,5.55 h0.9
  text "CSN" at -16.3,5.55 h0.9
  text "GND" at -11.3,5.55 h0.9
  text "GND" at -6.3,5.55 h0.9
  text "MOSI" at -16,4.05 h0.9
  text "TX" at -11.75,4.05 h0.9
  text "VCC" at -6.3,4.05 h0.9
  text "GND" at -16.3,2.55 h0.9
  text "RX" at -11.75,2.55 h0.9
  text "SWDIO" at -5.476,2.55 h0.9
  text "RET" at -16.3,1.05 h0.9
  text "SWCLK" at -5.401,1.05 h0.9
  text "RST" at -6.3,-0.45 h0.9
  text "S" at 5.3,-0.45 h0.9
  text "USB-C" at 21.333,-0.5 h1
  text "GND" at -15.147,-0.704 h0.9
  text "SCK" at -16.3,-1.95 h0.9
  text "GND" at -16.3,-3.45 h0.9
  text "+5V" at -16.3,-4.95 h0.9
  text "ENSURE CENTERED" at 6.598,-4.95 h0.9
  text "10" at -20.075,-6.45 h0.9
  text "+VBAT" at -14.901,-6.45 h0.9
  text "NOTE: P2 REVERSED" at -4.323,-9.204 h0.9
  text "B" at 0.333,-17.2 h1
  text "C" at 5.083,-17.2 h1
  text "A" at -4.417,-17.3 h1
Mechanical 13:
  circle w0.2: c0,0 r23.5

## Text inside footprints (layer, text, board x,y; h text height)
MT6835: Bottom Overlay "S" at 1.333,-0.5 h1; Bottom Overlay "N" at -0.667,-0.5 h1